# Altium PCB Side_PCB.PcbDoc (part 1 of 3)
Units mm, origin at the board's own origin, x right, y up, seen from the top; angles counter-clockwise.
Board outline 49.91 x 43.31 mm, 2 copper layers (Top Layer, Bottom Layer), stack 1.448 mm thick; 43 components, 50 nets, 194 pads, 110 vias.
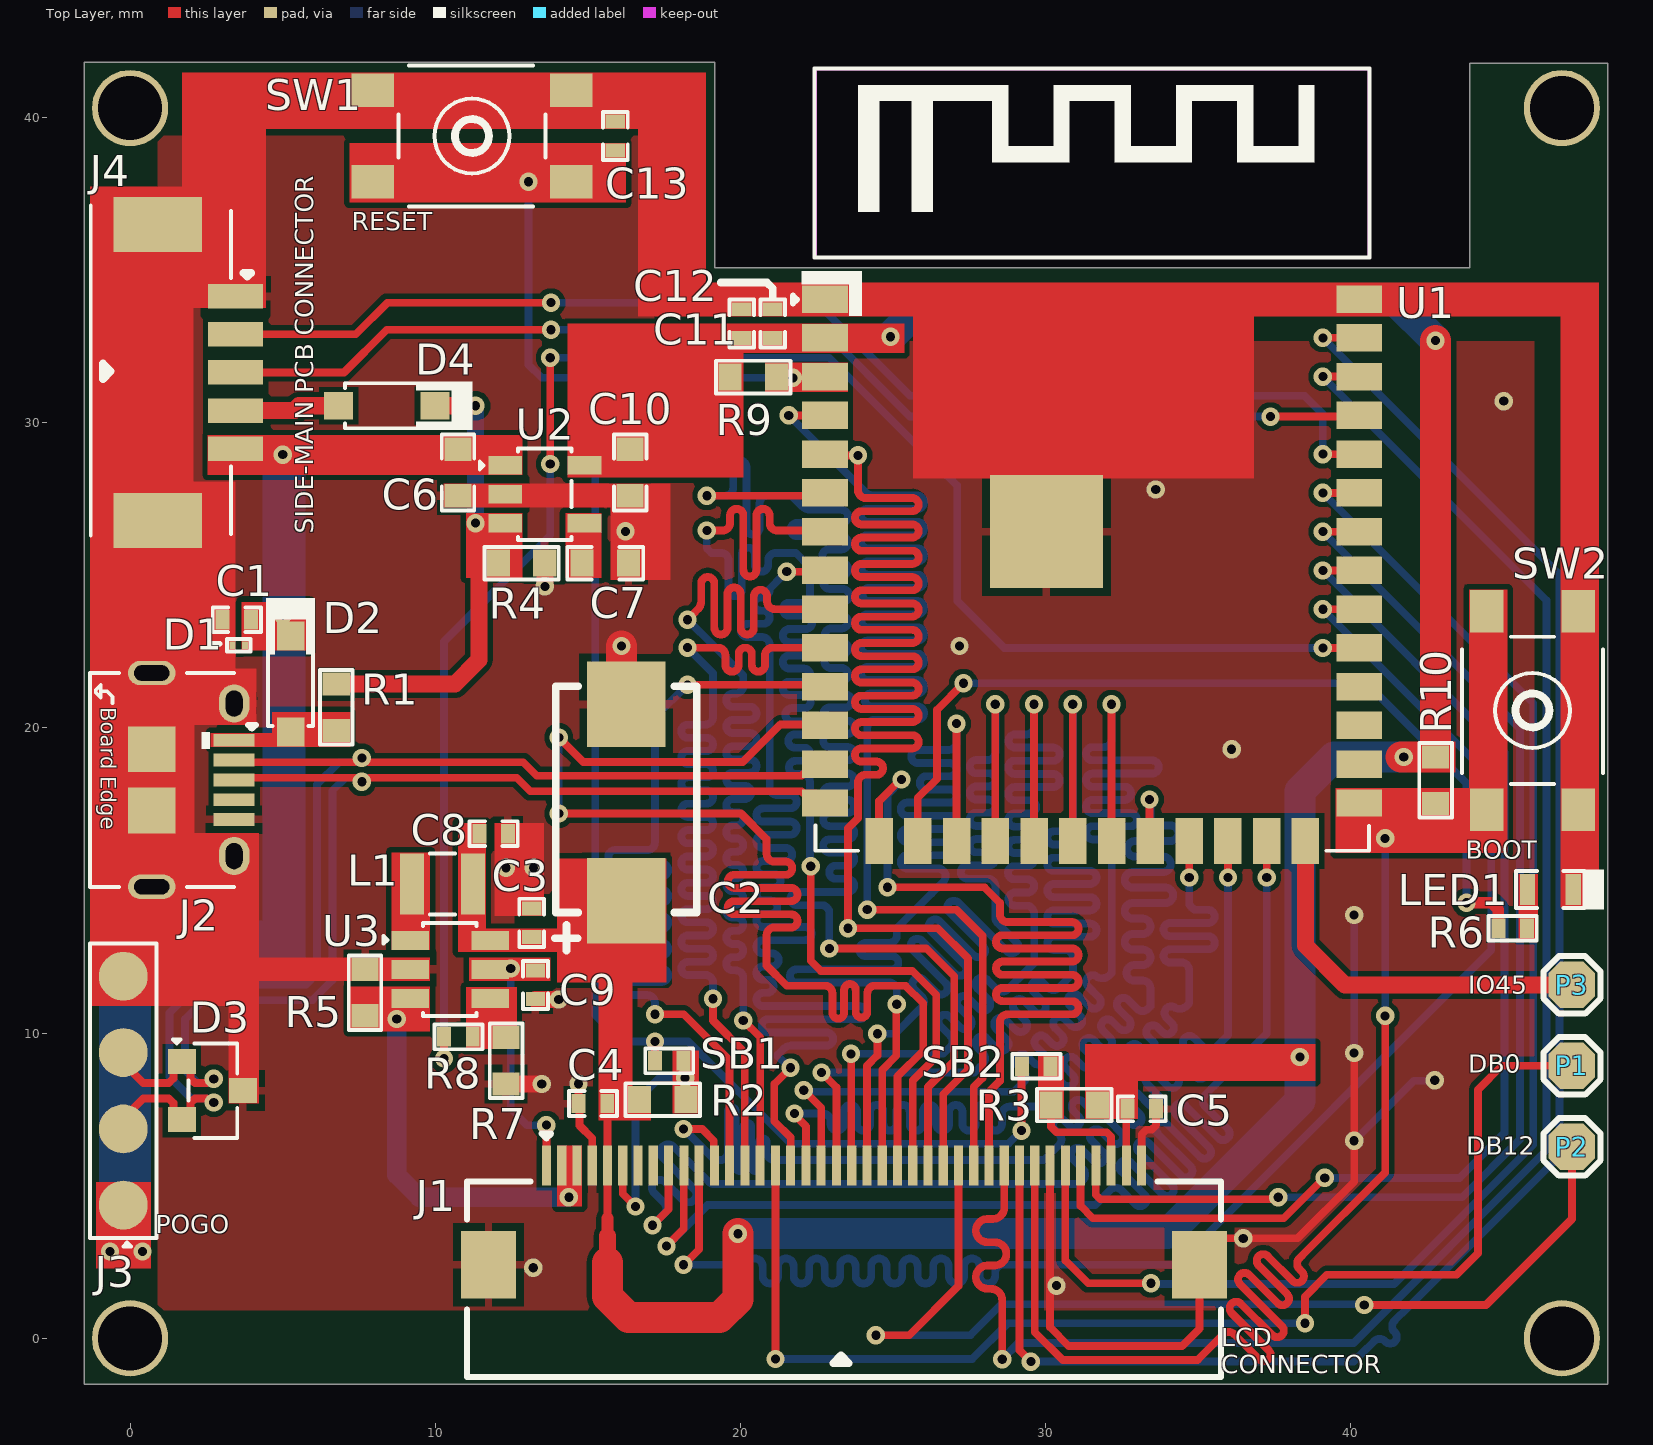
[diagram p0: Top Layer view]
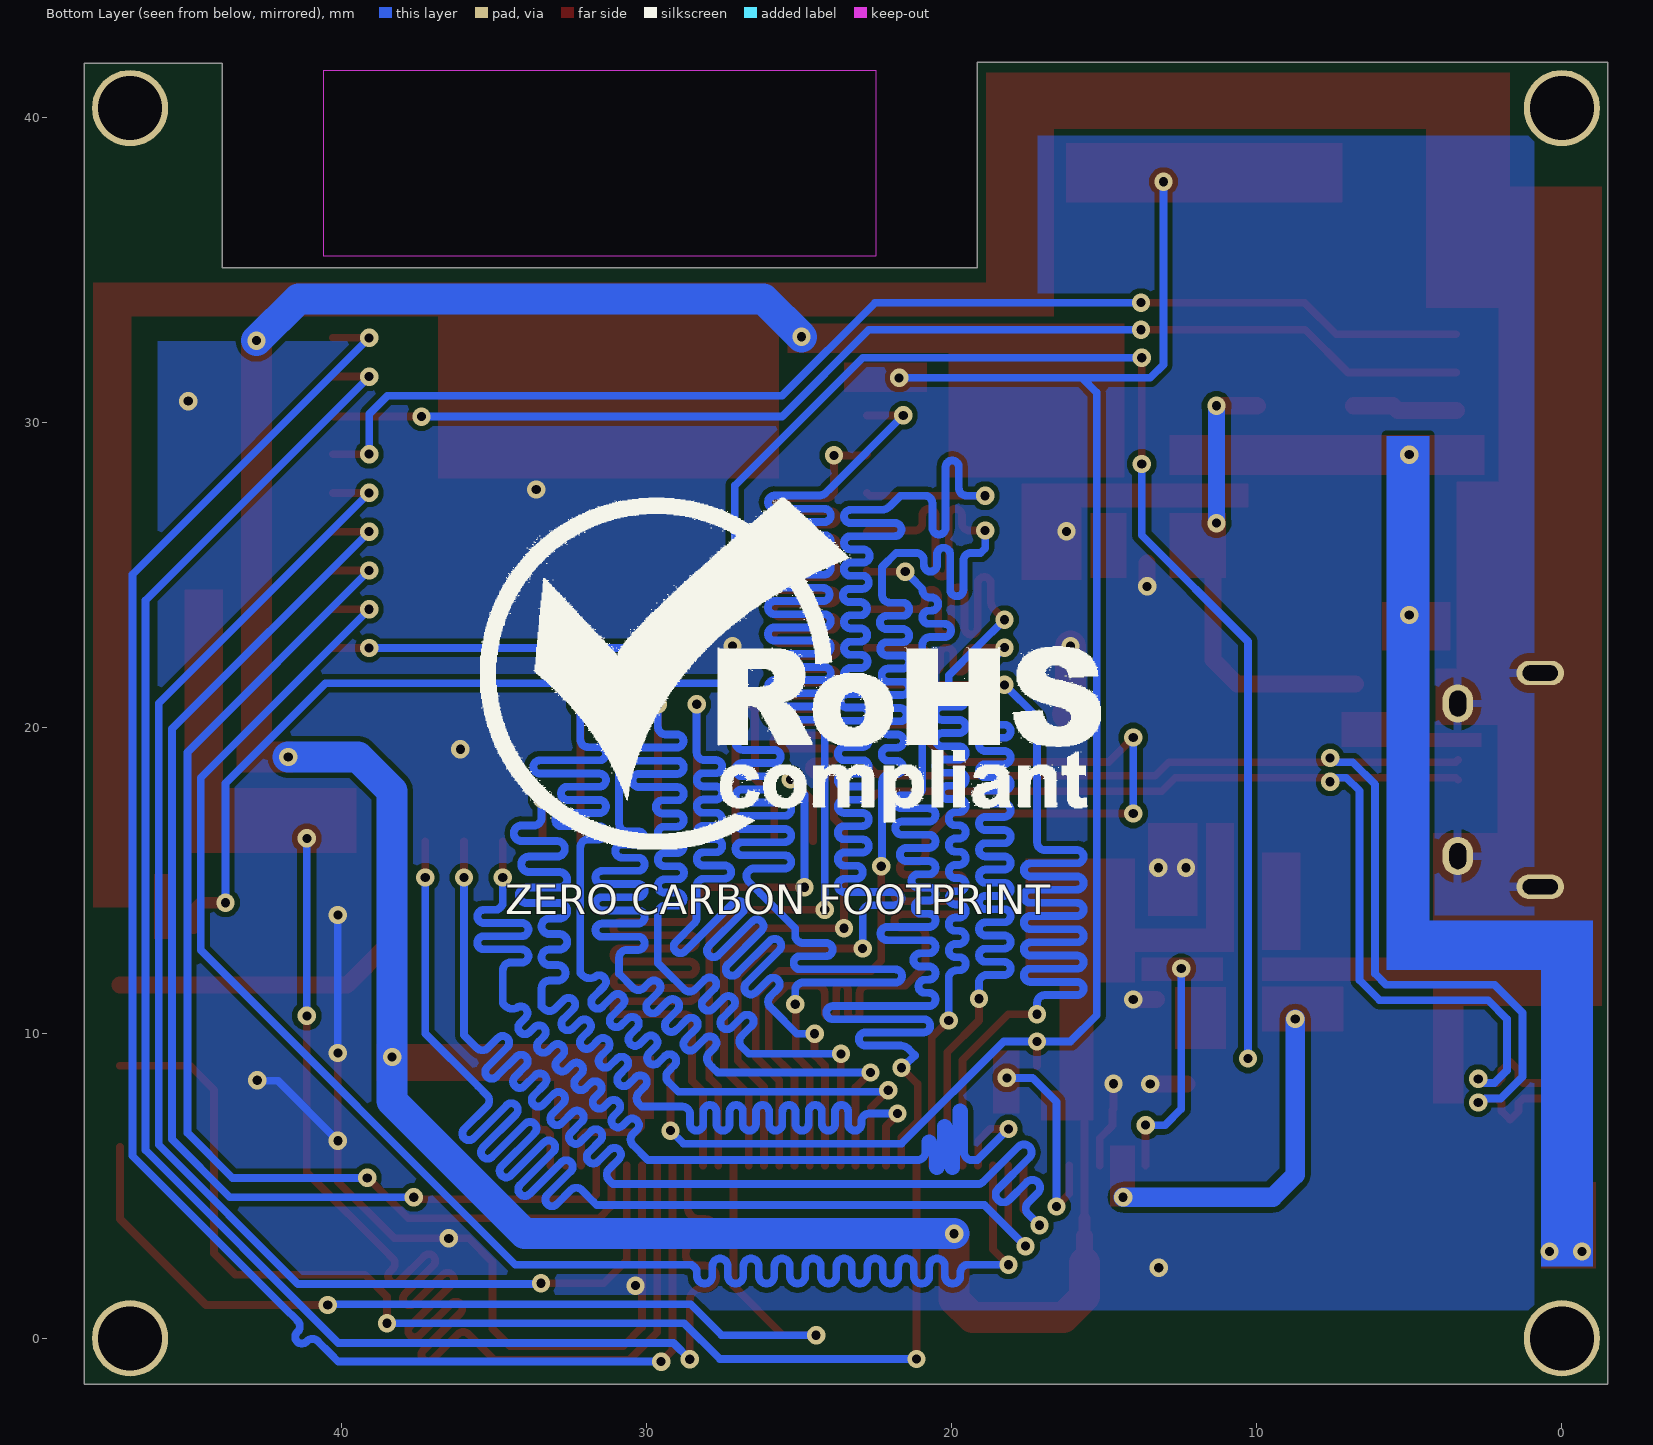
[diagram p1: Bottom Layer view, seen from below]
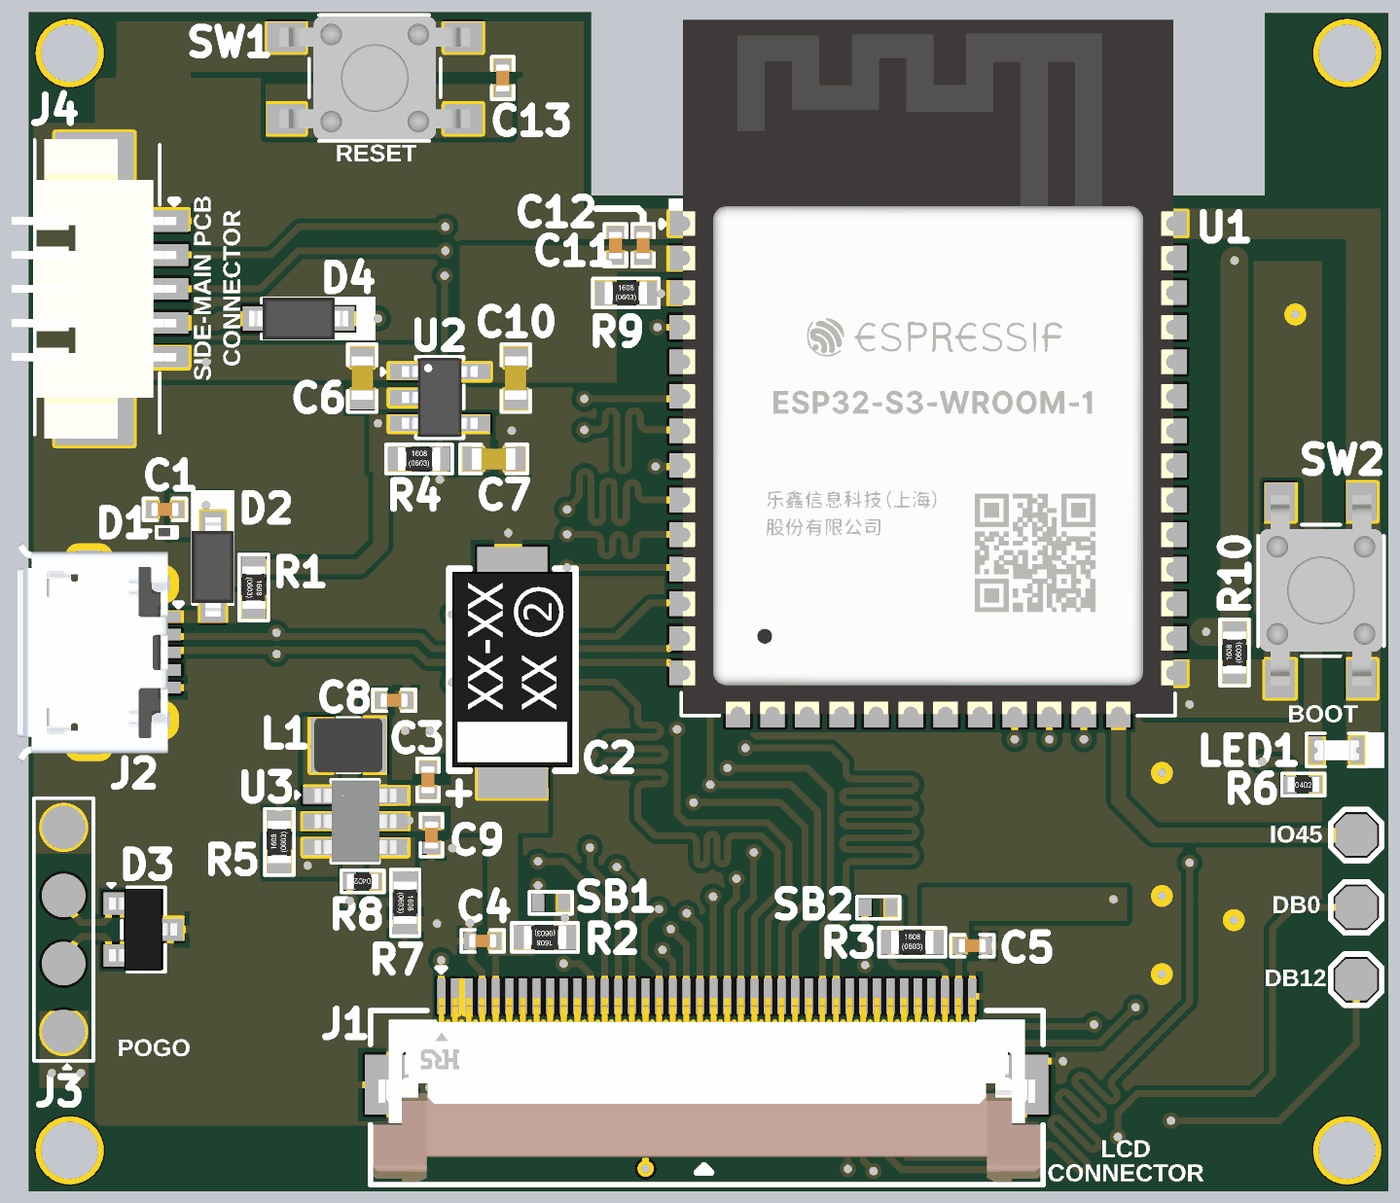
[diagram p3: 3D render of the assembled board from above, using the file's embedded part models]

## Layer stack, top to bottom
Top Solder: solder mask 0.0762, Solder Resist, Dk 3.5
Top Layer: signal copper 0.254
Dielectric 1: core 0.9398, FR-4, Dk 4.8
Bottom Layer: signal copper 0.254
Bottom Solder: solder mask 0.0762, Solder Resist, Dk 3.5

## Board outline
-1.499,-1.499 -1.499,41.808 19.152,41.808 19.152,35.077 43.891,35.077 43.891,41.783 48.412,41.783 48.412,-1.499

## Design rules (kind name [scope] priority, off if disabled: settings)
Clearance [All] p1: gap=0.178 ignorepadtopadclearanceinfootprint=FALSE except(0: Arc-Hole Track-Hole SMDPad-Hole THPad-Hole Via-Hole Fill-Hole Poly-Hole Region-Hole Text-Hole; 0.102: Arc-SMDPad Track-SMDPad SMDPad-SMDPad)
DiffPairsRouting [All] p1: maxlimit=0.254 minlimit=0.254 mostfreqgap=0.254 toplayer_minwidth=0.254 toplayer_maxwidth=0.254 toplayer_prefwidth=0.254 bottomlayer_minwidth=0.254 bottomlayer_maxwidth=0.254 bottomlayer_prefwidth=0.254 maxuncoupledlength=12.7
HoleSize [All] p1: absolutevalues=TRUE maxlimit=25.4 minlimit=0.025 maxpercent=80.000 minpercent=20.000
HoleToHoleClearance [All] p1: gap=0 allowstackedmicrovias=TRUE
MatchedLengths "Schematic Matched Net Lengths" [InNetClass('USB')] p1: tolerance=1.27 checknetsindiffpair=FALSE checkdiffpairvsdiffpair=TRUE checkxsignals=TRUE checkothers=TRUE
MaxMinImpedance "Schematic Impedance Constraint" [InNetClass('USB')] p1: minimum=85.00 maximum=90.00
MinimumSolderMaskSliver [All] p1: minsoldermaskwidth=0
PolygonConnect [All] p1: thpad.connectstyle=Relief thpad.reliefconductorwidth=0.254 thpad.reliefentries=4 thpad.polygonreliefangle="90 Angle" thpad.airgapwidth=0.254 smdpad.connectstyle=Relief smdpad.reliefconductorwidth=0.254 smdpad.reliefentries=4 smdpad.polygonreliefangle="90 Angle" smdpad.airgapwidth=0.254 via.connectstyle=Direct via.reliefconductorwidth=0.254 via.reliefentries=4 via.polygonreliefangle="90 Angle" via.airgapwidth=0.254
RoutingVias [All] p1: holewidth=0.3 width=0.6 viastyle="Through Hole" minholewidth=0.3 minwidth=0.6 maxholewidth=0.3 maxwidth=0.6
SilkToSilkClearance [All] p1: silktosilkclearance=0
SilkToSolderMaskClearance [IsPad] p1: minsilkscreentomaskgap=0 clearancetoexposedcopper=TRUE
SolderMaskExpansion [All] p1: expansion=0.102 istentingtop=FALSE
Width [All] p1: maxlimit=1.016 minlimit=0.254 preferedwidth=0.559
24 further rules are at their usual default settings.

## Classes and differential pairs
differential pair class USB_Lines: USB_D
net class USB: USB_D_N USB_D_P
differential pair USB_D: +USB_D_P -USB_D_N

## Components (designator, comment, footprint, x,y, rotation, side; value= is the part's Value field where it differs from the comment)
C1 "1uF" Cap-0402 3.496,23.546 r180 top
C2 "100uF" Case-E 16.256,14.337 r90 top locked
C3 "100nF" Cap-0402 13.157,13.614 r90 top locked
C4 "100nF" Cap-0402 15.164,7.696 r180 top locked
C5 "100nF" Cap-0402 33.147,7.518 r0 top locked
C6 "2.2uF" CAP-0603 10.744,28.372 r90 top locked
C7 "10nF" Cap-0603 15.57,25.4 r180 top locked
C8 "10uF" Cap-0402 11.913,16.535 r0 top locked
C9 "1uF" Cap-0402 13.284,11.582 r270 top locked
C10 "2.2uF" CAP-0603 16.383,28.372 r270 top locked
C11 "10uF" Cap-0402 20.041,33.249 r90 top locked
C12 "100nF" Cap-0402 21.057,33.249 r90 top locked
C13 "1uF" Cap-0402 15.9,39.395 r270 top locked
D1 "PESD5V0H1BSFYL" DSN0603-2 3.559,22.708 r180 top
D2 "1N4148W-7-F" SOD-123 5.258,21.438 r90 top locked value=2pF
D3 "ESD5302F-3/TR" Sot-23 2.697,8.114 r270 top locked
D4 "1N4148W-7-F" SOD-123 8.407,30.556 r0 top locked value=2pF
J1 "FH12A-40S-0.5SH(55)" FH12A-40S-0.5SH(55) 23.393,4.039 r180 top locked
J2 "10118194-0001LF" 10118194-0001LF_ 3.409,18.299 r270 top locked
J3 "POGO Connector 4 Pin" "Pogo 4 Pin" -0.224,8.114 r90 top locked
J4 "1.25-5PWB" 1.25-5PWB 2.184,31.648 r270 top locked
L1 "4.7uH" SLO252012F4R7MTT 10.236,14.884 r180 top locked
LED1 "Yellow" LED-0603 46.533,14.707 r0 top locked
P1 "TEST POINT" Test-point 47.244,8.928 r0 top locked
P2 "TEST POINT" Test-point 47.244,6.274 r0 top locked
P3 "TEST POINT" Test-point 47.244,11.582 r0 top locked
R1 "0R" Res-0603 6.756,20.676 r90 top locked
R2 "10K" Res-0603 17.45,7.823 r0 top locked
R3 "10K" Res-0603 30.937,7.645 r180 top locked
R4 "10K" Res-0603 12.827,25.4 r180 top locked
R5 "2.7R" Res-0603 7.696,11.328 r270 top locked
R6 "133R" Res-0402 45.301,13.437 r0 top locked
R7 "10K" Res-0603 12.319,9.093 r90 top locked
R8 "100R" Res-0402 10.757,9.881 r180 top locked
R9 "10K" Res-0603 20.422,31.496 r180 top locked
R10 "10K" Res-0603 42.774,18.288 r270 top locked
SB1 "Solder Bridge 0402" "Solder Bridge 0402" 17.666,9.093 r180 top locked
SB2 "Solder Bridge 0402" "Solder Bridge 0402" 29.693,8.915 r180 top locked
SW1 "TS-1109S-C-B" TS-1109S-C-B 11.201,39.395 r180 top locked
SW2 "TS-1109S-C-B" TS-1109S-C-B 45.949,20.574 r270 top locked
U1 "ESP32-S3-WROOM-1-N16R8" "41-SMD Module" 31.521,25.171 r0 top locked
U2 "SPX3819M5-L-3-3/TR" SOT-23-5 13.589,27.661 r0 top locked
U3 "AP3019AKTR-G1" SOT-23-6 10.49,12.09 r0 top locked

## Footprints (in the part's own frame and the unit in brackets; to place one, negate y for a bottom-side part, rotate by r counter-clockwise, add the part's x,y. Pads: shape width x height; smd on the part's side, far side on the other; paste and mask are expansions set on the pad)
1.25-5PWB [mm]
  rect 0.8x1.8 smd: 1(-2.5,1.275) 2(-1.25,1.275) 3(0,1.275) 4(1.25,1.275) 5(2.5,1.275)
  rect 1.8x2.9 smd: MP1(-4.85,-1.275) MP2(4.85,-1.275)
  silkscreen extent -5.47,-3.47 5.35,1.78, body extent -5.5,-4.32 5.5,1.73, height 3.56
"41-SMD Module" [mm]
  rect 1.5x0.9 smd: 1(-8.75,8.88) 2(-8.75,7.61) 3(-8.75,6.34) 4(-8.75,5.07) 5(-8.75,3.8) 6(-8.75,2.53) 7(-8.75,1.26) 8(-8.75,-0.01) 9(-8.75,-1.28) 10(-8.75,-2.55) 11(-8.75,-3.82) 12(-8.75,-5.09) 13(-8.75,-6.36) 14(-8.75,-7.63) 27(8.75,-7.63) 28(8.75,-6.36) 29(8.75,-5.09) 30(8.75,-3.82) 31(8.75,-2.55) 32(8.75,-1.28) 33(8.75,-0.01) 34(8.75,1.26) 35(8.75,2.53) 36(8.75,3.8) 37(8.75,5.07) 38(8.75,6.34) 39(8.75,7.61) 40(8.75,8.88)
  rect 0.9x1.5 smd: 15(-6.98,-8.88) 16(-5.71,-8.88) 17(-4.44,-8.88) 18(-3.17,-8.88) 19(-1.9,-8.88) 20(-0.63,-8.88) 21(0.64,-8.88) 22(1.91,-8.88) 23(3.18,-8.88) 24(4.45,-8.88) 25(5.72,-8.88) 26(6.99,-8.88)
  rect 3.7x3.7 smd: 41(-1.5,1.26)
  Keep-Out Layer region: -9.042,10.287 9.042,10.287 9.042,16.383 -9.042,16.383
  silkscreen extent -9.8,-9.2 9.09,16.43, body extent -9.01,-9.14 9.01,16.37, height 3.16
10118194-0001LF_ [mm]
  rect 0.42x1.35 smd: 1(-1.3,0) 2(-0.65,0) 3(0,0) 4(0.65,0) 5(1.3,0)
  oval 1.25x1 hole 0.55 slot 0.85 at 0 deg: MH1(-2.5,0) MH2(2.5,0)
  oval 0.8x1.55 hole 0.5 slot 1.15 at 90 deg: MH3(-3.5,-2.7) MH4(3.5,-2.7)
  rect 1.5x1.55 smd: MP1(-1,-2.7) MP2(1,-2.7)
  Top Layer region: 193 vertices and 0 holes, not listed, extent -4,-3.475 -2.3,-1.92
  Top Layer region: 193 vertices and 0 holes, not listed, extent 2.3,-3.48 4,-1.925
  silkscreen extent -3.51,-4.72 3.51,0.71, body extent -4.02,-5.34 4.03,0.19, height 2.69
Cap-0402 [mil]
  rect 18x25 smd mask+2.36: 1(-18.5,0) 2(18.5,0)
  silkscreen extent -31,-16 31,16, body extent -20,-10 20,10, height 19
CAP-0603 [mil]
  rect 30x35 smd mask+2.36: 1(-30,0) 2(30,0)
  silkscreen extent -49,-21 49,21, body extent -32,-16 31,16, height 34
Cap-0603 [mil]
  rect 30x35 smd mask+2.36: 1(-30,0) 2(30,0)
  silkscreen extent -49,-21 49,21, body extent -32,-16 31,16, height 34
Case-E [mm]
  rect 2.79x2.57 smd: 1(0,0) 2(6.44,0)
  silkscreen extent -1.63,-2.31 7.03,2.34, body extent -0.27,-2.21 6.92,2.21, height 2.88
DSN0603-2 [mm]
  rect 0.2x0.24 smd mask+0.055: 1(-0.2,0) 2(0.2,0)
  silkscreen extent -0.38,-0.2 0.38,0.2, body extent -0.3,-0.15 0.3,0.15, height 0.32
FH12A-40S-0.5SH(55) [mm]
  rect 0.3x1.3 smd: 1(9.75,-1.625) 2(9.25,-1.625) 3(8.75,-1.625) 4(8.25,-1.625) 5(7.75,-1.625) 6(7.25,-1.625) 7(6.75,-1.625) 8(6.25,-1.625) 9(5.75,-1.625) 10(5.25,-1.625) 11(4.75,-1.625) 12(4.25,-1.625) 13(3.75,-1.625) 14(3.25,-1.625) 15(2.75,-1.625) 16(2.25,-1.625) 17(1.75,-1.625) 18(1.25,-1.625) 19(0.75,-1.625) 20(0.25,-1.625) 21(-0.25,-1.625) 22(-0.75,-1.625) 23(-1.25,-1.625) 24(-1.75,-1.625) 25(-2.25,-1.625) 26(-2.75,-1.625) 27(-3.25,-1.625) 28(-3.75,-1.625) 29(-4.25,-1.625) 30(-4.75,-1.625) 31(-5.25,-1.625) 32(-5.75,-1.625) 33(-6.25,-1.625) 34(-6.75,-1.625) 35(-7.25,-1.625) 36(-7.75,-1.625) 37(-8.25,-1.625) 38(-8.75,-1.625) 39(-9.25,-1.625) 40(-9.75,-1.625)
  rect 1.8x2.2 smd: MP1(-11.65,1.625) MP2(11.65,1.625)
  silkscreen extent -12.35,-2.67 12.35,5.3, body extent -12.25,-1.57 12.25,5.21, height 3.5
LED-0603 [mm]
  rect 0.5x1 smd: 1(-0.75,0) 2(0.75,0)
  silkscreen extent -1.12,-0.66 1.75,0.66, body extent -0.82,-0.37 0.82,0.36, height 0.68
"Pogo 4 Pin" [mm]
  round 1.6 smd: 1(-3.75,0) 2(-1.25,0) 3(1.25,0) 4(3.75,0)
  silkscreen extent -5.11,-1.09 4.83,1.09
Res-0402 [mil]
  rect 18x25 smd mask+2.17: 1(-18.5,0) 2(18.5,0)
  silkscreen extent -32,-17 32,16, body extent -23,-11 23,11, height 16
Res-0603 [mil]
  rect 30x35 smd: 1(-30,0) 2(30,0)
  silkscreen extent -48,-21 48,21, body extent -31,-17 31,17, height 18
SLO252012F4R7MTT [mm]
  rect 0.8x2 smd: 1(-1,0) 2(1,0)
  silkscreen extent -0.41,-1 0.42,1, body extent -1.25,-1 1.25,1, height 1.2
SOD-123 [mm]
  rect 0.95x0.9 smd: 1(-1.575,0) 2(1.575,0)
  silkscreen extent -1.37,-0.8 2.82,0.8, body extent -1.82,-0.78 1.83,0.78, height 1.5
"Solder Bridge 0402" [mil]
  rect 18x25 smd mask+2.17: 1(-18.5,0) 2(18.5,0)
  silkscreen extent -32,-17 32,16
Sot-23 [mm] "TRANS NPN 40V 0.6A SOT23"
  rect 0.82x0.92 smd: 1(-0.95,-1) 2(0.95,-1) 3(0,1)
  silkscreen extent -1.68,-1.3 1.55,0.81, body extent -1.5,-1.25 1.5,1.25, height 1.05
SOT-23-5 [mm]
  rect 1.1x0.6 smd: 1(-1.3,0.95) 2(-1.3,0) 3(-1.3,-0.95) 4(1.3,-0.95) 5(1.3,0.95)
  silkscreen extent -2.13,-1.5 0.88,1.5, body extent -1.4,-1.45 1.4,1.45, height 1.45
SOT-23-6 [mm]
  rect 1.22x0.62 smd: 1(-1.31,0.95) 2(-1.31,0) 3(-1.31,-0.95) 4(1.31,-0.95) 5(1.31,0) 6(1.31,0.95)
  silkscreen extent -2.18,-1.52 0.86,1.52, body extent -1.5,-1.5 1.5,1.5, height 1.47
Test-point [mil]
  oct 60x60 smd: 1(0,0)
  silkscreen extent -37,-37 37,37
TS-1109S-C-B [mm]
  rect 1.4x1.1 smd: 1(-3.25,-1.5) 2(3.25,-1.5) 3(3.25,1.5) 4(-3.25,1.5)
  silkscreen extent -2.41,-2.31 2.41,2.31, body extent -3.5,-2.25 3.5,2.25, height 4.3

## Part data
C1 C9 C13: library part CC0402KRX5R8BB105, "CAP CER 1UF 25V X5R 0402", Case Code (Imperial)=0402, Case Code (Metric)=1005, Dielectric=X5R, LCSC Part Number=C326568, Manufacturer=Yageo, Max Operating Temperature=85°C, Min Operating Temperature=-55°C, Package Quantity=10000, Supplier Part Number 1=603-CC402KRX5R8BB105, Tolerance=10%, Voltage Rating=25V, Capacitance=1uF, Case/Package=0402, Category="Ceramic Capacitors", ComponentLink1Description=http://www.mouser.com/ds/2/447/Yageo_UPY-GP_NP0_16V-to-50V_9-358835.pdf?src-supplier=Mouser, ComponentLink1URL=http://www.mouser.com/ds/2/447/Yageo_UPY-GP_NP0_16V-to-50V_9-358835.pdf?src-supplier=Mouser, ComponentLink2Description=http://www.yageo.com/documents/recent/UPY-GPHC_X5R_4V-to-50V_25.pdf?src-supplier=Digi-Key, ComponentLink2URL=http://www.yageo.com/documents/recent/UPY-GPHC_X5R_4V-to-50V_25.pdf?src-supplier=Digi-Key, ComponentLink3Description=https://4donline.ihs.com/images/VipMasterIC/IC/YAGO/YAGO-S-A0006851646/YAGO-S-A0006851646-1.pdf?hkey=6D3A4C79FDBF58556ACFDE234799DDF0&src-supplier=Newark, ComponentLink3URL=https://4donline.ihs.com/images/VipMasterIC/IC/YAGO/YAGO-S-A0006851646/YAGO-S-A0006851646-1.pdf?hkey=6D3A4C79FDBF58556ACFDE234799DDF0&src-supplier=Newark, Halogen Free="Halogen Free", Lead Free="Lead Free", Length=0.039inch, Manufacturer Part Number=CC0402KRX5R8BB105, Mount="Surface Mount", Packaging="Tape and Reel", Pricing 1="1=0.30000, 10=0.20400, 50=0.20400, 100=0.11600, 1000=0.07200, 10000=0.05900 (USD)", RoHS=Yes, RoHS Compliant=Yes, Stock 1=91975, Supplier 1=Mouser, Termination=SMD/SMT, Thickness=0.022inch, Voltage Rating (DC)=25V, Weight=2.3E-05oz, Width=0.02inch
C2: library part TAJE107M025RNJ, "CAP TANT 100UF 20% 25V 2917", Case Code (Imperial)=2917, Case Code (Metric)=7343, ESR (Equivalent Series Resistance)=300mR, LCSC Part Number=C7230, Leakage Current=25uA, Manufacturer="Kyocera AVX", Max Operating Temperature=125°C, Min Operating Temperature=-55°C, Package Quantity=1, Supplier Part Number 1=581-TAJE107M025RNJ, Tolerance=20%, Voltage Rating=25V, Capacitance=100uF, Case/Package=2917, Category="Tantalum Capacitors", ComponentLink1Description=https://datasheet.ciiva.com/26787/taje107m025rnj-26787048.pdf?src-supplier=IIIC, ComponentLink1URL=https://datasheet.ciiva.com/26787/taje107m025rnj-26787048.pdf?src-supplier=IIIC, ComponentLink2Description=https://datasheet.ciiva.com/265/taj-265541.pdf?src-supplier=Digi-Key, ComponentLink2URL=https://datasheet.ciiva.com/265/taj-265541.pdf?src-supplier=Digi-Key, ComponentLink3Description=https://datasheet.ciiva.com/265/taj-265542.pdf?src-supplier=Digi-Key, ComponentLink3URL=https://datasheet.ciiva.com/265/taj-265542.pdf?src-supplier=Digi-Key, ComponentLink4Description=https://datasheet.ciiva.com/265/taj-265540.pdf?src-supplier=Digi-Key, ComponentLink4URL=https://datasheet.ciiva.com/265/taj-265540.pdf?src-supplier=Digi-Key, ComponentLink5Description=https://datasheet.ciiva.com/28609/1719052-28609254.pdf?src-supplier=Element14, ComponentLink5URL=https://datasheet.ciiva.com/28609/1719052-28609254.pdf?src-supplier=Element14, ComponentLink6Description=https://datasheet.ciiva.com/11230/taj-11230456.pdf?src-supplier=Avnet, ComponentLink6URL=https://datasheet.ciiva.com/11230/taj-11230456.pdf?src-supplier=Avnet, ComponentLink7Description=https://datasheet.ciiva.com/17339/taj-17339677.pdf?src-supplier=Avnet+Europe, ComponentLink7URL=https://datasheet.ciiva.com/17339/taj-17339677.pdf?src-supplier=Avnet+Europe, ComponentLink8Description=https://datasheet.ciiva.com/22667/1719052-22667581.pdf?src-supplier=Element14, ComponentLink8URL=https://datasheet.ciiva.com/22667/1719052-22667581.pdf?src-supplier=Element14, Construction=Flat, Depth=4.3mm, Dissipation Factor=10%, Features="General Purpose", Height=4.3mm, Height - Seated (Max)=0.169inch, Lead Free="Lead Free", Length=7.3mm, Manufacturer Part Number=TAJE107M025RNJ, Mount="Surface Mount", Number of Pins=2, Packaging="Tape and Reel", Polarity=Polar, Pricing 1="1=2.81000, 10=2.81000, 50=2.81000, 100=2.19000, 1000=1.76000, 10000=1.76000 (USD)", Radiation Hardening=No, REACH SVHC="No SVHC", RoHS=Yes, RoHS Compliant=Yes, Series=TAJ, Stock 1=109, Supplier 1=Mouser, Termination=SMD/SMT, Voltage Rating (DC)=25V, Width=4.3mm
C3 C4 C5 C12: library part CC0402KRX5R8BB104, "CAP CER 0.1UF 25V X5R 0402", Case Code (Imperial)=0402, Case Code (Metric)=1005, Dielectric=X5R, LCSC Part Number=C106256, Manufacturer=Yageo, Max Operating Temperature=85°C, Min Operating Temperature=-55°C, Resistor Type=Ceramic, Supplier Part Number 1=311-1697-1-ND, Tolerance=10%, Voltage Rating=25V, Capacitance=100nF, Case/Package=0402, Category="Ceramic Capacitors", ComponentLink1Description=http://www.mouser.com/ds/2/447/UPY-GPHC_X5R_4V-to-50V_25-1131599.pdf?src-supplier=Mouser, ComponentLink1URL=http://www.mouser.com/ds/2/447/UPY-GPHC_X5R_4V-to-50V_25-1131599.pdf?src-supplier=Mouser, ComponentLink2Description=http://www.yageo.com/documents/recent/UPY-GPHC_X5R_4V-to-50V-16.pdf?src-supplier=Future+Electronics, ComponentLink2URL=http://www.yageo.com/documents/recent/UPY-GPHC_X5R_4V-to-50V-16.pdf?src-supplier=Future+Electronics, ComponentLink3Description=http://www.yageo.com/documents/recent/UPY-GPHC_X5R_4V-to-50V_25.pdf?src-supplier=Digi-Key, ComponentLink3URL=http://www.yageo.com/documents/recent/UPY-GPHC_X5R_4V-to-50V_25.pdf?src-supplier=Digi-Key, Depth=0.5mm, Halogen Free="Halogen Free", Item Type=Capacitor, Lead Free="Lead Free", Length=0.039inch, Manufacturer Part Number=CC0402KRX5R8BB104, Mount="Surface Mount", Packaging="Tape and Reel", Pricing 1="1=0.10000, 10=0.03800, 50=0.02100, 100=0.01710, 500=0.01224, 1000=0.00961, 2500=0.00874, 5000=0.00804 (USD)", RoHS=Yes, RoHS Compliant=Yes, Series=CC, Stock 1=4598218, Supplier 1=Digi-Key, Thickness=0.022inch, Voltage Rating (DC)=25V, Width=0.02inch
C6 C10: library part CC0603KRX5R8BB225, "CAP CER 2.2UF 25V X5R 0603", Case Code (Imperial)=0603, Case Code (Metric)=1608, Dielectric=X5R, LCSC Part Number=C309478, Manufacturer=Yageo, Max Operating Temperature=85°C, Min Operating Temperature=-55°C, Package Quantity=4000, Resistor Type=Ceramic, Supplier Part Number 1=311-1786-1-ND, Tolerance=10%, Voltage Rating=25V, Capacitance=2.2uF, Case/Package=0603, ComponentLink1Description=https://www.verical.com/server-webapp/html/getDatasheet?partID=782757&src-supplier=Verical, ComponentLink1URL=https://www.verical.com/server-webapp/html/getDatasheet?partID=782757&src-supplier=Verical, Depth=0.8mm, Halogen Free="Halogen Free", Lead Free="Lead Free", Length=1.6mm, Manufacturer Part Number=CC0603KRX5R8BB225, Mount="Surface Mount", Packaging="Tape and Reel", Pricing 1="1=0.4, 10=0.276, 50=0.1932, 100=0.1656, 500=0.1242, 1000=0.10488 (USD)", Radiation Hardening=No, RoHS Compliant=Yes, Stock 1=687936, Supplier 1=Digi-Key, Termination=SMD/SMT, Thickness=0.037inch, Voltage Rating (DC)=25V, Weight=7.1E-05oz, Width=0.031inch
C7: library part CC0603JRNPO9BN103, "CAP CER 10000PF 50V C0G/NPO 0603", Case/Package=0603, LCSC Part Number=C389113, Manufacturer=Yageo, Max Operating Temperature=125°C, Min Operating Temperature=-55°C, Tolerance=5%, Voltage Rating=50V, Capacitance=10nF, Category="Ceramic Capacitors", ComponentLink1Description=http://www.yageo.com/documents/recent/UPY-GP_NP0_16V-to-50V_16.pdf?src-supplier=Digi-Key, ComponentLink1URL=http://www.yageo.com/documents/recent/UPY-GP_NP0_16V-to-50V_16.pdf?src-supplier=Digi-Key, ComponentLink2Description=http://www.yageo.com/exep/pages/download/literatures/ProductSelectionGuide%202014_Final_2.pdf?src-supplier=Digi-Key, ComponentLink2URL=http://www.yageo.com/exep/pages/download/literatures/ProductSelectionGuide%202014_Final_2.pdf?src-supplier=Digi-Key, Item Type=Capacitor, Length=0.063inch, Manufacturer Part Number=CC0603JRNPO9BN103, Mount="Surface Mount", Packaging="Tape and Reel", Pricing 1="1=0.42340, 10=0.29770, 25=0.25590, 100=0.19550, 250=0.19360, 500=0.14320, 1000=0.12060, 3000=0.11930 (USD)", RoHS=Yes, RoHS Compliant=Yes, Stock 1=5425, Supplier 1="Arrow Electronics", Supplier Part Number 1=CC0603JRNPO9BN103, Thickness=0.035inch, Width=0.031inch
C8 C11: library part CC0402MRX5R6BB106, "CAP CER 10UF 10V X5R 0402", Case Code (Imperial)=0402, Case Code (Metric)=1005, LCSC Part Number=C962143, Manufacturer=Yageo, Max Operating Temperature=85°C, Min Operating Temperature=-55°C, Supplier Part Number 1=6097631, Tolerance=20%, Voltage Rating=10V, Capacitance=10uF, Case/Package=0402, Category="Ceramic Capacitors", ComponentLink1Description=http://www.yageo.com/documents/recent/UPY-GPHC_X5R_4V-to-50V_25.pdf?src-supplier=Digi-Key, ComponentLink1URL=http://www.yageo.com/documents/recent/UPY-GPHC_X5R_4V-to-50V_25.pdf?src-supplier=Digi-Key, Item Type=Capacitor, Manufacturer Part Number=CC0402MRX5R6BB106, Mount="Surface Mount", Packaging="Tape and Reel", Pricing 1="10000=0.02650, 20000=0.02590, 30000=0.02550, 40000=0.02530, 50000=0.02450 (USD)", RoHS=Yes, RoHS Compliant=Yes, Stock 1=80000, Supplier 1="Future Electronics"
D1: "TVS DIODE 5VWM 6.3VC DSN0603-2", LCSC Part Number=C477989, Manufacturer=Nexperia, Category="ESD and Circuit Protection ICs", ComponentLink1Description=http://www.farnell.com/datasheets/1961312.pdf?src-supplier=Farnell, ComponentLink1URL=http://www.farnell.com/datasheets/1961312.pdf?src-supplier=Farnell, ComponentLink2Description=https://assets.nexperia.com/documents/data-sheet/PESD5V0H1BSF.pdf?src-supplier=Digi-Key, ComponentLink2URL=https://assets.nexperia.com/documents/data-sheet/PESD5V0H1BSF.pdf?src-supplier=Digi-Key, ComponentLink3Description=http://www.farnell.com/datasheets/1961312.pdf?src-supplier=Newark, ComponentLink3URL=http://www.farnell.com/datasheets/1961312.pdf?src-supplier=Newark, Item Type=Diode, Manufacturer Part Number=PESD5V0H1BSFYL, Pricing 1="18000=0.06453, 36000=0.06278, 54000=0.06104, 90000=0.05930, 180000=0.05755, 900000=0.05581, 1800000=0.05406 (USD)", RoHS=Yes, RoHS Compliant=Yes, Stock 1=9000, Supplier 1=Avnet, Supplier Part Number 1=PESD5V0H1BSFYL
D2 D4: "DIODE GEN PURP 100V 300MA SOD123", Average Rectified Current=300mA, Current Rating=150mA, Forward Voltage=1.25V, LCSC Part Number=C83528, Manufacturer=Diodes, Max Forward Surge Current (Ifsm)=2A, Max Operating Temperature=150°C, Max Repetitive Reverse Voltage (Vrrm)=100V, Max Reverse Current=1uA, Min Operating Temperature=-65°C, Package Quantity=3000, Power Dissipation=400mW, Supplier Part Number 1=7634694, Voltage Rating (DC)=75V, Category="Rectifier Diodes", ComponentLink1Description=https://datasheet.ciiva.com/1179/1915529-1179304.pdf?src-supplier=Element14, ComponentLink1URL=https://datasheet.ciiva.com/1179/1915529-1179304.pdf?src-supplier=Element14, ComponentLink2Description=https://datasheet.ciiva.com/22695/1915529-22695239.pdf?src-supplier=Element14, ComponentLink2URL=https://datasheet.ciiva.com/22695/1915529-22695239.pdf?src-supplier=Element14, ComponentLink3Description=https://datasheet.ciiva.com/8300/ds30086-8300392.pdf?src-supplier=Avnet, ComponentLink3URL=https://datasheet.ciiva.com/8300/ds30086-8300392.pdf?src-supplier=Avnet, ComponentLink4Description=https://datasheet.ciiva.com/15219/getdatasheetpartid-110030-15219548.pdf?src-supplier=Verical, ComponentLink4URL=https://datasheet.ciiva.com/15219/getdatasheetpartid-110030-15219548.pdf?src-supplier=Verical, ComponentLink5Description=https://datasheet.ciiva.com/8303/ds30086-8303197.pdf?src-supplier=Avnet, ComponentLink5URL=https://datasheet.ciiva.com/8303/ds30086-8303197.pdf?src-supplier=Avnet, ComponentLink6Description=https://datasheet.ciiva.com/911/ds30086-911735.pdf?src-supplier=Digi-Key, ComponentLink6URL=https://datasheet.ciiva.com/911/ds30086-911735.pdf?src-supplier=Digi-Key, ComponentLink7Description=https://datasheet.ciiva.com/911/ds30086-911736.pdf?src-supplier=Digi-Key, ComponentLink7URL=https://datasheet.ciiva.com/911/ds30086-911736.pdf?src-supplier=Digi-Key, ComponentLink8Description=https://datasheet.ciiva.com/911/ds30086-911734.pdf?src-supplier=Digi-Key, ComponentLink8URL=https://datasheet.ciiva.com/911/ds30086-911734.pdf?src-supplier=Digi-Key, ComponentLink9Description=https://datasheet.ciiva.com/4435/ds30086-4435128.pdf?src-supplier=Mouser, ComponentLink9URL=https://datasheet.ciiva.com/4435/ds30086-4435128.pdf?src-supplier=Mouser, Contact Plating=Tin,Matte, Element Configuration=Single, Forward Current=150mA, Height=1.25mm, Item Type=Diode, Lead Free="Lead Free", Length=2.85mm, Manufacturer Part Number=1N4148W-7-F, Max Reverse Voltage (DC)=100V, Max Surge Current=2A, Mounting Technology="Surface Mount", Output Current=150mA, Packaging="Tape and Reel", Peak Non-Repetitive Surge Current=2A, Pins=2, Polarity=Standard, Power Rating=400mW, Pricing 1="3000=0.01840, 12000=0.01760, 45000=0.01690, 120000=0.01640, 300000=0.01560 (USD)", Radiation Hardening=No, Reach SVHC Compliant=Yes, Recovery Time=4ns, Reverse Recovery Time=4ns, Reverse Recovery Time-Max=4ns, RoHS=Yes, RoHS Compliant=Yes, Series=-, Stock 1=32931000, Supplier 1="Future Electronics", Voltage=100V, Weight=0.000353oz, Width=1.7mm
D3: "16A 20V 7V 5V@Max Unidirectional SOT-23 TVS ROHS", LCSC Part Number=C239643, Manufacturer=WILLSEMI, Package=SOT-23, ComponentLink1Description=LCSC, ComponentLink1URL=https://www.lcsc.com/product-detail/TVS_WILLSEMI-Will-Semicon-ESD5302F-3-TR_C239643.html, Item Type=Diode, Manufacturer Part Number=ESD5302F-3/TR
J1: "CONN FFC TOP 40POS 0.50MM R/A", Contact Resistance=50mR, Dielectric Withstanding Voltage (AC)=150V, Flammability Rating="UL94 V-0", Insulation Color=Beige, Insulation Resistance=500MR, Manufacturer=Hirose, Max Operating Temperature=85°C, Min Operating Temperature=-40°C, Rated Current (Signal)=500mA, Supplier Part Number 1=6882839P, Additional Feature="ROHS COMPLIANT", Board Mounting Option="SOLDER HOLDING POSTS", Body Breadth=0.079inch, Body Depth=0.276inch, Body Length=0.965inch, Category="FFC / FPC", ComponentLink1Description=https://datasheet.ciiva.com:443/pdfs/VipMasterIC/IC/HIRO/HIRO-S-A0001800623/HIRO-S-A0003173477-1.pdf?src-supplier=IHS+Markit, ComponentLink1URL=https://datasheet.ciiva.com:443/pdfs/VipMasterIC/IC/HIRO/HIRO-S-A0001800623/HIRO-S-A0003173477-1.pdf?src-supplier=IHS+Markit, ComponentLink2Description=https://datasheet.ciiva.com/14667/0900766b80806912-14667338.pdf?src-supplier=Rs, ComponentLink2URL=https://datasheet.ciiva.com/14667/0900766b80806912-14667338.pdf?src-supplier=Rs, ComponentLink3Description=https://datasheet.ciiva.com/15176/getdatasheetpartid-432540-15176844.pdf?src-supplier=Verical, ComponentLink3URL=https://datasheet.ciiva.com/15176/getdatasheetpartid-432540-15176844.pdf?src-supplier=Verical, ComponentLink4Description=https://datasheet.ciiva.com/11745/0900766b80d985fc-11745193.pdf?src-supplier=Rs, ComponentLink4URL=https://datasheet.ciiva.com/11745/0900766b80d985fc-11745193.pdf?src-supplier=Rs, Connector Type="CARD EDGE CONNECTOR", Contact Finish - Mating="GOLD (8)", Contact Finish - Termination="Gold (Au) - with Nickel (Ni) barrier", Contact Gender=Female, Contact Material=Bronze, Contact Pattern=RECTANGULAR, Contact Style="BELLOWED TYPE", DIN Conformance=No, Durability=20Cycles, Filter Feature=No, IEC Conformance=No, Insulation Material=Polyamide, JESD-609 Code=e4, Manufacturer Part Number=FH12A-40S-0.5SH(55), Mating Contact Pitch=0.02inch, MIL Conformance=No, Mixed Contacts=No, Mounting Option 1=LOCKING, Mounting Style="RIGHT ANGLE", Mounting Technology=Board, Number of Contacts=40, Number Of PCB Rows=1, Number of Rows Loaded=1, Option="General Purpose", PCB Contact Pattern=RECTANGULAR, Pricing 1="200=1.21900, 750=1.09200, 3000=0.99700, 6000=0.89700 (GBP)", Reach SVHC Compliant=Yes, Reference Standard=UL, Reliability=COMMERCIAL, RoHS=Yes, RoHS Compliant=Yes, Stock 1=1020, Supplier 1=Rs, Terminal Pitch=0.5mm, Termination=SMD/SMT
J2: "CONN RCPT USB2.0 MICRO B SMD R/A", Color=Black, Current Rating=1.8A, Flammability Rating="UL94 V-0", Insulation Resistance=1GR, LCSC Part Number=C132563, Manufacturer="Amphenol FCI", Max Operating Temperature=85°C, Max Voltage Rating (AC)=100V, Min Operating Temperature=-55°C, Package Quantity=9600, Supplier Part Number 1=609-4618-1-ND, ComponentLink1Description=http://www.amphenol-icc.com/media/wysiwyg/files/drawing/10118194.pdf?src-supplier=Digi-Key, ComponentLink1URL=http://www.amphenol-icc.com/media/wysiwyg/files/drawing/10118194.pdf?src-supplier=Digi-Key, ComponentLink2Description=https://cdn.amphenol-icc.com/media/wysiwyg/files/drawing/10118194.pdf?src-supplier=Mouser, ComponentLink2URL=https://cdn.amphenol-icc.com/media/wysiwyg/files/drawing/10118194.pdf?src-supplier=Mouser, ComponentLink3Description=https://cdn.amphenol-icc.com/media/wysiwyg/files/drawing/10118194.pdf?src-supplier=Verical, ComponentLink3URL=https://cdn.amphenol-icc.com/media/wysiwyg/files/drawing/10118194.pdf?src-supplier=Verical, Connector Type=USB,Receptacle, Contact Material="Copper Alloy", Contact Plating=Gold, Depth=5mm, Features=Shielded, Gender=Receptacle, Housing Material=Polymer, Item Type="USB Connector", Lead Free="Lead Free", Length=8.05mm, Manufacturer Part Number=10118194-0001LF, Mount="Surface Mount,Horizontal", Number of Contacts=5, Number of Ports=1, Number of Terminals=5, Orientation="Right Angle", Packaging="Tape and Reel", Pitch=0.65mm, Pricing 1="1=0.43, 10=0.405, 25=0.3648, 50=0.3242, 100=0.3107, 250=0.28368, 500=0.27016 (USD)", Radiation Hardening=No, Stock 1=35943, Supplier 1=Digi-Key, Termination=Solder
J3: "Pogo Pad 2.5mm 4 Pin", Item Type="Pogo Connector", Manufacturer Part Number="POGO Connector 4 Pin"
J4: "1x5P 1 1.25mm Male pin 5 -25℃~+85℃ Surface Mount SMD,P=1.25mm Wire To Board / Wire To Wire Connector ROHS", LCSC Part Number=C2905012, Manufacturer=DEALON, Package=SMD,P=1.25mm, ComponentLink1Description=LCSC, ComponentLink1URL=https://www.lcsc.com/product-detail/Wire-To-Board-Wire-To-Wire-Connector_DEALON-1-25-5PWB_C2905012.html, Item Type="JST Right Angle", Manufacturer Part Number=1.25-5PWB
L1: library part SLO252012F4R7MTT, "1.55A 4.7uH ±20% SMD Power Inductors ROHS", LCSC Part Number=C275675, Manufacturer="Sunltech Tech", Package=SMD, ComponentLink1Description=LCSC, ComponentLink1URL=https://www.lcsc.com/product-detail/Power-Inductors_Sunltech-Tech-SLO252012F4R7MTT_C275675.html, Item Type=Inductor, Manufacturer Part Number=SLO252012F4R7MTT
LED1: library part NCD0603Y2, "yellow 0603 Light Emitting Diodes (LED) ROHS", LCSC Part Number=C89811, Manufacturer="Foshan NationStar Optoelectronics", Package=0603, ComponentLink1Description=LCSC, ComponentLink1URL=https://www.lcsc.com/product-detail/Light-Emitting-Diodes-LED_Foshan-NationStar-Optoelectronics-NCD0603Y2_C89811.html, Item Type=LED, Manufacturer Part Number=NCD0603Y2
P1 P2 P3: "Test Point ON", Item Type="TEST POINT"
R1: library part RC0603JR-070RL, "RES 0 OHM JUMPER 1/10W 0603", Case Code (Imperial)=0603, Case Code (Metric)=1608, LCSC Part Number=C95177, Manufacturer=Yageo, Max Operating Temperature=155°C, Max Power Dissipation=100mW, Min Operating Temperature=-55°C, Package Quantity=5000, Resistance=0mR, Resistance Tolerance=5%, Resistor Type="Thick Film", Supplier Part Number 1=311-0.0GRCT-ND, Temperature Coefficient=200ppm/°C, Tolerance=1%, Voltage Rating=50V, Case/Package=0603, Category="Chip SMD Resistors", Construction=Rectangular, Contact Plating=Tin,Matte, Depth=0.8mm, Features="Moisture Resistant", Height=0.45mm, Item Type=Resistor, Lead Free="Lead Free", Length=1.6mm, Manufacturer Part Number=RC0603JR-070RL, Military Standard=Not, Number of Pins=2, Number of Terminations=2, Packaging="Tape and Reel", Power Rating=100mW, Pricing 1="1=0.10000, 10=0.01700, 25=0.01240, 50=0.00960, 100=0.00700, 250=0.00536, 500=0.00430, 1000=0.00316 (USD)", Radiation Hardening=No, Reach SVHC Compliant="No SVHC", RoHS=Yes, RoHS Compliant=Yes, Series=RC, Size Code=0603, Stock 1=18081776, Supplier 1=Digi-Key, Technology="THICK FILM", Termination=SMD/SMT, Voltage Rating (DC)=50V, Width=0.8mm
R2 R3 R4 R7 R9 R10: library part RC0603FR-0710KL, "RES SMD 10K Ohm 1% 1/10W 0603", Case Code (Imperial)=0603, Case Code (Metric)=1608, LCSC Part Number=C98220, Manufacturer=Yageo, Max Operating Temperature=155°C, Max Power Dissipation=100mW, Min Operating Temperature=-55°C, Resistance=10kR, Resistance Tolerance=1%, Resistor Type="Thick Film", Supplier Part Number 1=311-10.0KHRCT-ND, Temperature Coefficient=100ppm/°C, Voltage Rating=75V, Voltage Rating (DC)=50V, Case/Package=0603, Category="Chip SMD Resistors", ComponentLink1Description=https://datasheet.ciiva.com/7660/38590-7660789.pdf?src-supplier=Element14, ComponentLink1URL=https://datasheet.ciiva.com/7660/38590-7660789.pdf?src-supplier=Element14, ComponentLink2Description=https://datasheet.ciiva.com/7983/443971-7983596.pdf?src-supplier=Element14, ComponentLink2URL=https://datasheet.ciiva.com/7983/443971-7983596.pdf?src-supplier=Element14, ComponentLink3Description=https://datasheet.ciiva.com/22747/443971-22747519.pdf?src-supplier=Element14, ComponentLink3URL=https://datasheet.ciiva.com/22747/443971-22747519.pdf?src-supplier=Element14, ComponentLink4Description=https://datasheet.ciiva.com/46440/1868787-46440891.pdf?src-supplier=Element14, ComponentLink4URL=https://datasheet.ciiva.com/46440/1868787-46440891.pdf?src-supplier=Element14, ComponentLink5Description=https://datasheet.ciiva.com/7746/1738695-7746239.pdf?src-supplier=Element14, ComponentLink5URL=https://datasheet.ciiva.com/7746/1738695-7746239.pdf?src-supplier=Element14, ComponentLink6Description=https://datasheet.ciiva.com/15189/getdatasheetpartid-409289-15189591.pdf?src-supplier=Verical, ComponentLink6URL=https://datasheet.ciiva.com/15189/getdatasheetpartid-409289-15189591.pdf?src-supplier=Verical, Construction=Rectangular, Depth=0.8mm, Features="Moisture Resistant", Height=0.45mm, Lead Free="Lead Free", Lead Pitch=0.3mm, Length=1.6mm, Manufacturer Part Number=RC0603FR-0710KL, Military Standard=Not, Number of Pins=2, Number of Terminations=2, Packaging="Tape and Reel", Power Rating=100mW, Pricing 1="1=0.10000, 10=0.02400, 100=0.00970, 1000=0.00436, 2500=0.00378 (USD)", REACH SVHC=Unknown, RoHS=Yes, RoHS Compliant=Yes, Series=RC, Size Code=0603, Stock 1=25249139, Supplier 1=Digi-Key, Termination=SMD/SMT, Tolerance=1%, Weight=7.1E-05oz, Width=0.8mm
  R4 R7: Item Type=Resistor
R5: library part RC0603FR-072R7L, "RES 2.7 OHM 1% 1/10W 0603", Case Code (Imperial)=0603, Case Code (Metric)=1608, LCSC Part Number=C309560, Manufacturer=Yageo, Max Operating Temperature=155°C, Max Power Dissipation=100mW, Min Operating Temperature=-55°C, Resistance Tolerance=1%, Resistor Type="Thick Film", Supplier Part Number 1=1109246, Temperature Coefficient=200ppm/°C, Voltage Rating=50V, Case/Package=0603, Category="Chip SMD Resistors", ComponentLink1Description=https://datasheet.ciiva.com/12555/rc0603-272842-12555304.pdf?src-supplier=Mouser, ComponentLink1URL=https://datasheet.ciiva.com/12555/rc0603-272842-12555304.pdf?src-supplier=Mouser, ComponentLink2Description=https://datasheet.ciiva.com/7746/443971-7746325.pdf?src-supplier=Element14, ComponentLink2URL=https://datasheet.ciiva.com/7746/443971-7746325.pdf?src-supplier=Element14, ComponentLink3Description=https://datasheet.ciiva.com/7746/443971-7746326.pdf?src-supplier=Element14, ComponentLink3URL=https://datasheet.ciiva.com/7746/443971-7746326.pdf?src-supplier=Element14, Features="Moisture Resistant", Height=0.022inch, Item Type=Resistor, Lead Free="Lead Free", Length=0.063inch, Manufacturer Part Number=RC0603FR-072R7L, Number of Terminations=2, Packaging="Tape and Reel", Pins=2, Power Rating=100mW, Pricing 1="5000=0.0036, 25000=0.0034, 125000=0.0032, 250000=0.0031, 750000=0.0029 (USD)", Reach SVHC Compliant=Unknown, RoHS=Yes, RoHS Compliant=Yes, Series=RC, Stock 1=55000, Supplier 1="Future Electronics", Termination=SMD/SMT, Tolerance=1%, Voltage Rating (DC)=50V, Width=0.8mm
R6: library part RC0402FR-07133RL, "RES 133 OHM 1% 1/16W 0402", Case Code (Imperial)=0402, Case Code (Metric)=1005, LCSC Part Number=C60490, Manufacturer=Yageo, Max Operating Temperature=155°C, Max Power Dissipation=63mW, Min Operating Temperature=-55°C, Power Rating=62.5mW, Resistor Type="Thick Film", Supplier Part Number 1=603-RC0402FR-07133RL, Temperature Coefficient=100ppm/°C, Tolerance=1%, Voltage Rating=50V, Case/Package=0402, Category="Chip SMD Resistors", ComponentLink1Description=https://datasheet.ciiva.com/8887/pyu-rc0402-51-rohs-l-6-8887451.pdf?src-supplier=Avnet, ComponentLink1URL=https://datasheet.ciiva.com/8887/pyu-rc0402-51-rohs-l-6-8887451.pdf?src-supplier=Avnet, Construction=Rectangular, Contact Plating=Tin,Matte, Depth=0.5mm, Features="Moisture Resistant", Height=0.016inch, Lead Free="Lead Free", Length=1mm, Manufacturer Part Number=RC0402FR-07133RL, Military Standard=Not, Number of Terminations=2, Packaging="Tape and Reel", Pricing 1="1=0.10000, 10=0.01200, 50=0.01200, 100=0.00500, 1000=0.00300, 2500=0.00200, 10000=0.00100 (USD)", Resistance=133R, RoHS=Yes, RoHS Compliant=Yes, Series=RC, Size Code=0402, Stock 1=12475, Supplier 1=Mouser, Termination=SMD/SMT, Width=0.02inch
R8: library part RC0402FR-07100RL, "RES 100 OHM 1% 1/16W 0402", Case Code (Imperial)=0402, Case Code (Metric)=1005, LCSC Part Number=C106232, Manufacturer=Yageo, Max Operating Temperature=155°C, Max Power Dissipation=63mW, Min Operating Temperature=-55°C, Power Rating=62.5mW, Resistance Tolerance=1%, Resistor Type="Thick Film", Supplier Part Number 1=603-RC0402FR-07100RL, Temperature Coefficient=100ppm/°C, Voltage Rating=50V, Case/Package=0402, Category="Chip SMD Resistors", ComponentLink1Description=https://datasheet.ciiva.com/11808/0900766b80c66297-11808765.pdf?src-supplier=RSComponents, ComponentLink1URL=https://datasheet.ciiva.com/11808/0900766b80c66297-11808765.pdf?src-supplier=RSComponents, ComponentLink2Description=https://datasheet.ciiva.com/7849/1784430-7849810.pdf?src-supplier=Element14, ComponentLink2URL=https://datasheet.ciiva.com/7849/1784430-7849810.pdf?src-supplier=Element14, ComponentLink3Description=https://datasheet.ciiva.com/28367/1018594-28367226.pdf?src-supplier=Element14, ComponentLink3URL=https://datasheet.ciiva.com/28367/1018594-28367226.pdf?src-supplier=Element14, ComponentLink4Description=https://datasheet.ciiva.com/22747/1018594-22747511.pdf?src-supplier=Element14, ComponentLink4URL=https://datasheet.ciiva.com/22747/1018594-22747511.pdf?src-supplier=Element14, ComponentLink5Description=https://datasheet.ciiva.com/12667/pyu-rc0402-51-rohs-l-6-r-12667957.pdf?src-supplier=Mouser, ComponentLink5URL=https://datasheet.ciiva.com/12667/pyu-rc0402-51-rohs-l-6-r-12667957.pdf?src-supplier=Mouser, ComponentLink6Description=https://datasheet.ciiva.com/15189/getdatasheetpartid-329466-15189335.pdf?src-supplier=Verical, ComponentLink6URL=https://datasheet.ciiva.com/15189/getdatasheetpartid-329466-15189335.pdf?src-supplier=Verical, ComponentLink7Description=https://datasheet.ciiva.com/16740/pyu-rc0402-51-rohs-l-6-r-16740566.pdf?src-supplier=Future+Electronics, ComponentLink7URL=https://datasheet.ciiva.com/16740/pyu-rc0402-51-rohs-l-6-r-16740566.pdf?src-supplier=Future+Electronics, Construction=Rectangular, Depth=0.5mm, Features="Moisture Resistant", Height=0.32mm, Lead Free="Lead Free", Length=1mm, Manufacturer Part Number=RC0402FR-07100RL, Military Standard=Not, Number of Pins=2, Number of Terminations=2, Packaging="Tape and Reel", Pricing 1="1=0.10000, 10=0.01200, 50=0.01200, 100=0.00500, 1000=0.00300, 2500=0.00200, 10000=0.00100 (USD)", REACH SVHC="No SVHC", Resistance=100R, RoHS=Yes, RoHS Compliant=Yes, Series=RC, Size Code=0402, Stock 1=699545, Supplier 1=Mouser, Technology="THICK FILM", Termination=SMD/SMT, Tolerance=1%, Voltage Rating (DC)=50V, Width=0.5mm
SB1 SB2: "Solder Bridge ON", Item Type="Solder Bridge", Manufacturer Part Number="Solder Bridge 0402"
SW1 SW2: "No NO 50mA 4.5mm 100000 260gf 12V -30℃~+85℃ 4.5mm 4.3mm Black Round Button Brick nogging SPST SMD Tactile Switches ROHS", LCSC Part Number=C381037, Manufacturer="XKB Connectivity", Package=Custom, ComponentLink1Description=LCSC, ComponentLink1URL=https://www.lcsc.com/product-detail/Tactile-Switches_XKB-Connectivity-TS-1109S-C-B_C381037.html, Item Type=Switch, Manufacturer Part Number=TS-1109S-C-B
U1: "SMD MODULE, ESP32-S3R8 WITH 3.3V", LCSC Part Number=C2913202, Manufacturer="Espressif Systems", Supplier Part Number 1=1965-ESP32-S3-WROOM-1-N16R8CT-ND, Category=Uncategorized, ComponentLink1Description=LCSC, ComponentLink1URL=https://www.lcsc.com/product-detail/WiFi-Modules_Espressif-Systems-ESP32-S3-WROOM-1-N16R8_C2913202.html, Item Type=Module, Manufacturer Part Number=ESP32-S3-WROOM-1-N16R8, Pricing 1="1=4.29000 (USD)", RoHS=No, Stock 1=423, Supplier 1=Digi-Key
U2: "SPX3819 Series 3.3 V 500 mA Fixed Output SMT LDO Regulator - SOT-23-5", LCSC Part Number=C9055, Manufacturer=MaxLinear, Supplier Part Number 1=23R9703, Category="Voltage Regulators - Linear", ComponentLink1Description=LCSC, ComponentLink1URL=https://www.lcsc.com/product-detail/Linear-Voltage-Regulators-LDO_MaxLinear-SPX3819M5-L-3-3-TR_C9055.html, Item Type=IC, Manufacturer Part Number=SPX3819M5-L-3-3/TR, RoHS=Yes, RoHS Compliant=Yes, Supplier 1=Newark
U3: "IC LED DRVR RGLTR PWM SOT23-6", Case/Package=SOT-23-6, Frequency=1.2MHz, LCSC Part Number=C44956, Manufacturer=Diodes, Max Operating Temperature=85°C, Max Output Voltage=38V, Max Supply Current=3.2mA, Max Supply Voltage=16V, Min Input Voltage=2.5V, Min Operating Temperature=-40°C, Operating Frequency="1.2 MHz", Output Current=150mA, Output Current per Channel=550mA, Package Quantity=3000, Supplier Part Number 1=8048337, Category="LED Drivers", ComponentLink1Description=https://datasheet.ciiva.com/29602/ap3019a-29602771.pdf?src-supplier=Digi-Key, ComponentLink1URL=https://datasheet.ciiva.com/29602/ap3019a-29602771.pdf?src-supplier=Digi-Key, Dimming=PWM, Item Type=IC, Manufacturer Part Number=AP3019AKTR-G1, Mounting Technology="Surface Mount", Number of Channels=1, Number of Outputs=1, Packaging="Tape and Reel", Pins=6, Pricing 1="3000=0.116, 9000=0.113, 15000=0.112, 45000=0.109, 75000=0.106 (USD)", RoHS=Yes, RoHS Compliant=Yes, Series=-, Stock 1=6000, Supplier 1="Future Electronics", Switching Frequency=1.2MHz, Topology=Boost, Weight=0.000529oz

## Free pads (board coordinates)
  round 2.5 hole 2.1 mask+0.05: MH(0,40.31) MH(0,0) MH(46.914,40.31) MH(46.914,0)

## Via types
v1: diameter 0.6, hole 0.3, Top Layer to Bottom Layer, tented both sides, 102 vias
v2: diameter 0.6, hole 0.3, Top Layer to Bottom Layer, 8 vias

## Nets (pads, with @x,y where several pads share a name; then routed paths per layer and width w, separated by ;. In a path a pad name is that pad's centre, name@x,y a point inside that pad or via, vN(x,y) a via of type N, cw(c..) or ccw(c..) an arc to the next point about the centre after c; other vN are vias at no path point)
3.3V: C2.1 C3.1 C4.1 C5.1 C8.1 C10.1 C11.1 C12.1 J1.5 J1.39 L1.1 R2.1 R3.1 R9.2 R10.1 U1.2 U2.5 U3.6 | length 84
  Top Layer w0.254: C4.1@15.634,7.518 15.639,7.514 J1.5@15.639,5.664 ; 15.643,3.94 J1.5@15.643,5.664 ; 32.156,8.42 32.643,7.933 J1.39@32.643,5.664
  Top Layer w0.406: 15.643,3.35 15.643,3.94
  Top Layer w0.559: 15.643,2.489 15.643,3.35
  Top Layer w1.016: 15.643,2.489 15.643,1.375 16.332,0.686 19.318,0.686 19.914,1.281 v1(19.914,3.429) ; v1@41.645,19.05 v1(41.732,19.05) R10.1@42.774,19.05 v1(42.774,32.69)
  Bottom Layer w1.016: v1(19.914,3.429) 33.985,3.429 38.329,7.772 38.329,17.932 39.446,19.05 v1(41.732,19.05) ; v1(24.917,32.817) 26.162,34.061 41.402,34.061 v1(42.774,32.69)
  other v1: 38.329,9.22
5V: C1.1 C6.2 D1.1 D2.2 J3.1 J4.5 U2.1 | length 1.3
  Top Layer w1.016: -0.335,3.195 -0.335,4.252 J3.1@-0.224,4.364
  Bottom Layer w1.016: -0.224,12.901 -0.171,12.954
  other v1: -0.66,2.845 0.406,2.845 5.004,23.698 5.004,28.956
5V#: D2.1 J2.1 R1.1
EN_: C13.2 R9.1 SB1.2 SB2.2 SW1.3 SW1.4 U1.3 | length 56.1
  Top Layer w0.254: SB1.2@17.196,8.915 SB1.2@17.196,9.093 v1(17.196,9.728) ; v1(29.21,6.807) SB2.2@29.21,8.903
  Top Layer w0.559: v1(13.054,37.895) SW1.4@14.451,37.895
  Bottom Layer w0.254: v1(13.054,37.895) 13.054,31.904 13.487,31.471 15.723,31.471 ; v1(21.717,31.471) 15.723,31.471 ; v1(29.21,6.807) 28.778,6.375 21.641,6.375 18.288,9.728 v1(17.196,9.728) 16.104,9.728 15.24,10.592 15.24,30.988 15.723,31.471
ESP_RX: J4.2 U1.36 | length 40.1
  Top Layer w0.254: J4.2@3.459,32.898 7.397,32.898 8.433,33.934 v1(13.792,33.934) ; v1(39.081,28.971) U1.36@40.271,28.971
  Bottom Layer w0.254: v1(13.792,33.934) 22.504,33.934 25.552,30.886 38.481,30.886 39.081,30.287 v1(39.081,28.971)
ESP_TX: J4.3 U1.37 | length 38.6
  Top Layer w0.254: J4.3@3.459,31.648 7.01,31.648 8.407,33.045 v1(13.792,33.045) ; v1(37.363,30.201) 40.231,30.201 U1.37@40.271,30.241
  Bottom Layer w0.254: v1(13.792,33.045) 22.708,33.045 25.552,30.201 v1(37.363,30.201)
GND: C1.2 C2.2 C3.2 C4.2 C5.2 C6.1 C7.1 C8.2 C9.2 C10.2 C11.2 C12.2 C13.1 D1.2 D3.3 J1.4 J1.34 J1.40 J1.MP1 J1.MP2 J2.5 J2.MH1 J2.MH2 J2.MH3 J2.MH4 J2.MP1 J2.MP2 J3.4 J4.1 J4.MP1 J4.MP2 LED1.2 R4.1 R5.1 R7.1 SW1.1 SW1.2 SW2.3 SW2.4 U1.1 U1.40 U1.41 U2.2 U3.2 | length 41.9
  Top Layer w0.254: v1@12.243,15.418 12.294,15.367 12.751,15.367 ; v1(14.694,8.344) C4.2@14.694,7.696 14.694,7.518 14.727,7.485 14.727,6.975 15.143,6.558 J1.4@15.143,5.664 ; J1.34@30.143,5.664 30.143,0.362 30.759,-0.254 34.468,-0.254 35.043,0.322 35.043,2.504 35.816,3.277 v1(36.474,3.277) 38.252,3.277 40.107,5.131 v2(40.107,6.477) v2(40.107,9.347) ; v1(30.353,1.727) v1@30.378,1.727 ; J1.40@33.143,5.664 33.143,6.684 33.292,6.833 33.468,6.833 33.617,6.981 C5.2@33.617,7.518
  Top Layer w0.559: R7.1@12.281,8.331 R7.1@12.319,8.331 v1(13.487,8.331) ; C9.2@13.284,11.1 v1(14.046,11.1) ; v1(13.589,24.638) R4.1@13.589,25.4
  Top Layer w1.016: v1(16.104,22.682) 16.104,20.562 C2.2@16.205,20.461
  Bottom Layer w0.254: v1@27.051,22.682 v1(27.178,22.682) ; v2(40.107,6.477) 42.067,8.438 42.728,8.438 v2(42.748,8.458) ; v2(40.107,9.347) v2(40.107,13.868)
  other v1: 13.208,2.311 12.319,15.418 13.222,15.418 16.231,26.441
  other v2: 36.093,19.304 33.604,27.813 45.009,30.709
IO40: R6.1 U1.16 | length 29.3
  Top Layer w0.254: U1.16@25.811,16.291 25.811,17.709 26.441,18.339 26.441,20.599 v1(27.305,21.463)
  Top Layer w0.381: v1(43.79,14.275) 44.608,14.275 44.831,14.052 R6.1@44.831,13.437
  Bottom Layer w0.254: v1(27.305,21.463) 40.513,21.463 43.79,18.186 v1(43.79,14.275)
LCD_BL: R8.2 U1.31 | length 57.8
  Top Layer w0.254: v1(10.287,9.169) R8.2@10.287,9.881 ; v1(13.767,28.651) v1(13.767,32.131) ; v1(39.081,22.621) U1.31@40.271,22.621
  Bottom Layer w0.254: v1(10.287,9.169) 10.287,22.835 13.767,26.314 v1(13.767,28.651) ; v1(13.767,32.131) 22.911,32.131 27.102,27.94 27.102,24.161 28.641,22.621 v1(39.081,22.621)
LCD_CS: J1.11 U1.32 | length 59.3
  Top Layer w0.254: v1(18.136,2.413) 18.643,2.921 J1.11@18.643,5.664 ; v1(39.081,23.891) U1.32@40.271,23.891
  Bottom Layer w0.254: v1(18.136,2.413) 18.821,2.413 19.456,2.413 cw(c19.456,2.159) 19.71,2.159 19.71,2.048 ccw(c19.964,2.048) 20.218,2.048 20.218,2.362 cw(c20.472,2.362) 20.726,2.362 20.726,2.048 ccw(c20.98,2.048) 21.234,2.048 21.234,2.362 cw(c21.488,2.362) 21.742,2.362 21.742,2.048 ccw(c21.996,2.048) 22.25,2.048 22.25,2.362 cw(c22.504,2.362) 22.758,2.362 22.758,2.048 ccw(c23.012,2.048) 23.266,2.048 23.266,2.362 cw(c23.52,2.362) 23.774,2.362 23.774,2.048 ccw(c24.028,2.048) 24.282,2.048 24.282,2.362 cw(c24.536,2.362) 24.79,2.362 24.79,2.048 ccw(c25.044,2.048) 25.298,2.048 25.298,2.362 cw(c25.552,2.362) 25.806,2.362 25.806,2.048 ccw(c26.06,2.048) 26.314,2.048 26.314,2.362 cw(c26.568,2.362) 26.822,2.362 26.822,2.048 ccw(c27.076,2.048) 27.33,2.048 27.33,2.362 cw(c27.584,2.362) 27.838,2.362 27.838,2.048 ccw(c28.092,2.048) 28.346,2.048 28.346,2.159 cw(c28.6,2.159) 28.6,2.413 29.046,2.413 34.29,2.413 44.602,12.725 44.602,18.37 v1(39.081,23.891)
LCD_DB1: J1.17 U1.8 | length 47.4
  Top Layer w0.254: v1(21.514,25.121) 22.731,25.121 U1.8@22.771,25.161 ; v1(21.641,8.865) 21.107,8.331 21.107,7.118 21.643,6.582 J1.17@21.643,5.664
  Bottom Layer w0.254: v1(21.514,25.121) 21.354,24.96 20.955,24.562 20.955,24.528 cw(c20.701,24.528) 20.701,24.274 20.656,24.274 ccw(c20.656,24.058) 20.656,23.842 20.739,23.842 cw(c20.739,23.626) 20.739,23.41 20.23,23.41 ccw(c20.23,23.194) 20.23,22.978 20.701,22.978 cw(c20.701,22.724) 20.955,22.724 20.955,18.051 ccw(c21.209,18.051) 21.209,17.797 21.628,17.797 cw(c21.628,17.581) 21.628,17.365 20.739,17.365 ccw(c20.739,17.149) 20.739,16.933 21.628,16.933 cw(c21.628,16.717) 21.628,16.501 20.739,16.501 ccw(c20.739,16.286) 20.739,16.07 21.481,16.07 cw(c21.481,15.854) 21.481,15.638 20.739,15.638 ccw(c20.739,15.422) 20.739,15.206 21.093,15.206 cw(c21.093,14.99) 21.093,14.774 20.739,14.774 ccw(c20.739,14.558) 20.739,14.342 20.993,14.342 cw(c20.993,14.127) 20.993,13.911 20.739,13.911 ccw(c20.739,13.695) 20.739,13.479 22.11,13.479 cw(c22.11,13.263) 22.11,13.047 20.739,13.047 ccw(c20.739,12.831) 20.739,12.615 21.032,12.615 cw(c21.032,12.399) 21.032,12.183 20.739,12.183 ccw(c20.739,11.968) 20.739,11.752 20.866,11.752 cw(c20.866,11.536) 20.866,11.32 20.739,11.32 ccw(c20.739,11.104) 20.739,10.888 23.888,10.888 cw(c23.888,10.672) 23.888,10.456 20.912,10.456 ccw(c20.912,10.24) 20.912,10.024 22.822,10.024 cw(c22.822,9.809) 22.822,9.593 21.669,9.593 ccw(c21.67,9.224) 21.412,9.487 21.218,9.297 ccw(c21.641,8.865) 21.189,9.266 21.307,9.161 21.429,9.053 21.572,8.926 v1(21.641,8.865)
LCD_DB2: J1.18 U1.22 | length 48.1
  Top Layer w0.254: v1@21.768,7.417 21.768,7.323 22.146,6.945 22.146,5.666 J1.18@22.143,5.664 ; U1.22@33.401,16.322 v1(33.401,17.653)